# Altium PCB PCB_old.PcbDoc
Units mm, origin at the board's own origin, x right, y up, seen from the top; angles counter-clockwise.
Board outline 120 x 80 mm, 2 copper layers (Top Layer, Bottom Layer); 110 components, 84 nets, 483 pads, 0 vias.
Unrouted connection lines stored in the file: 293.
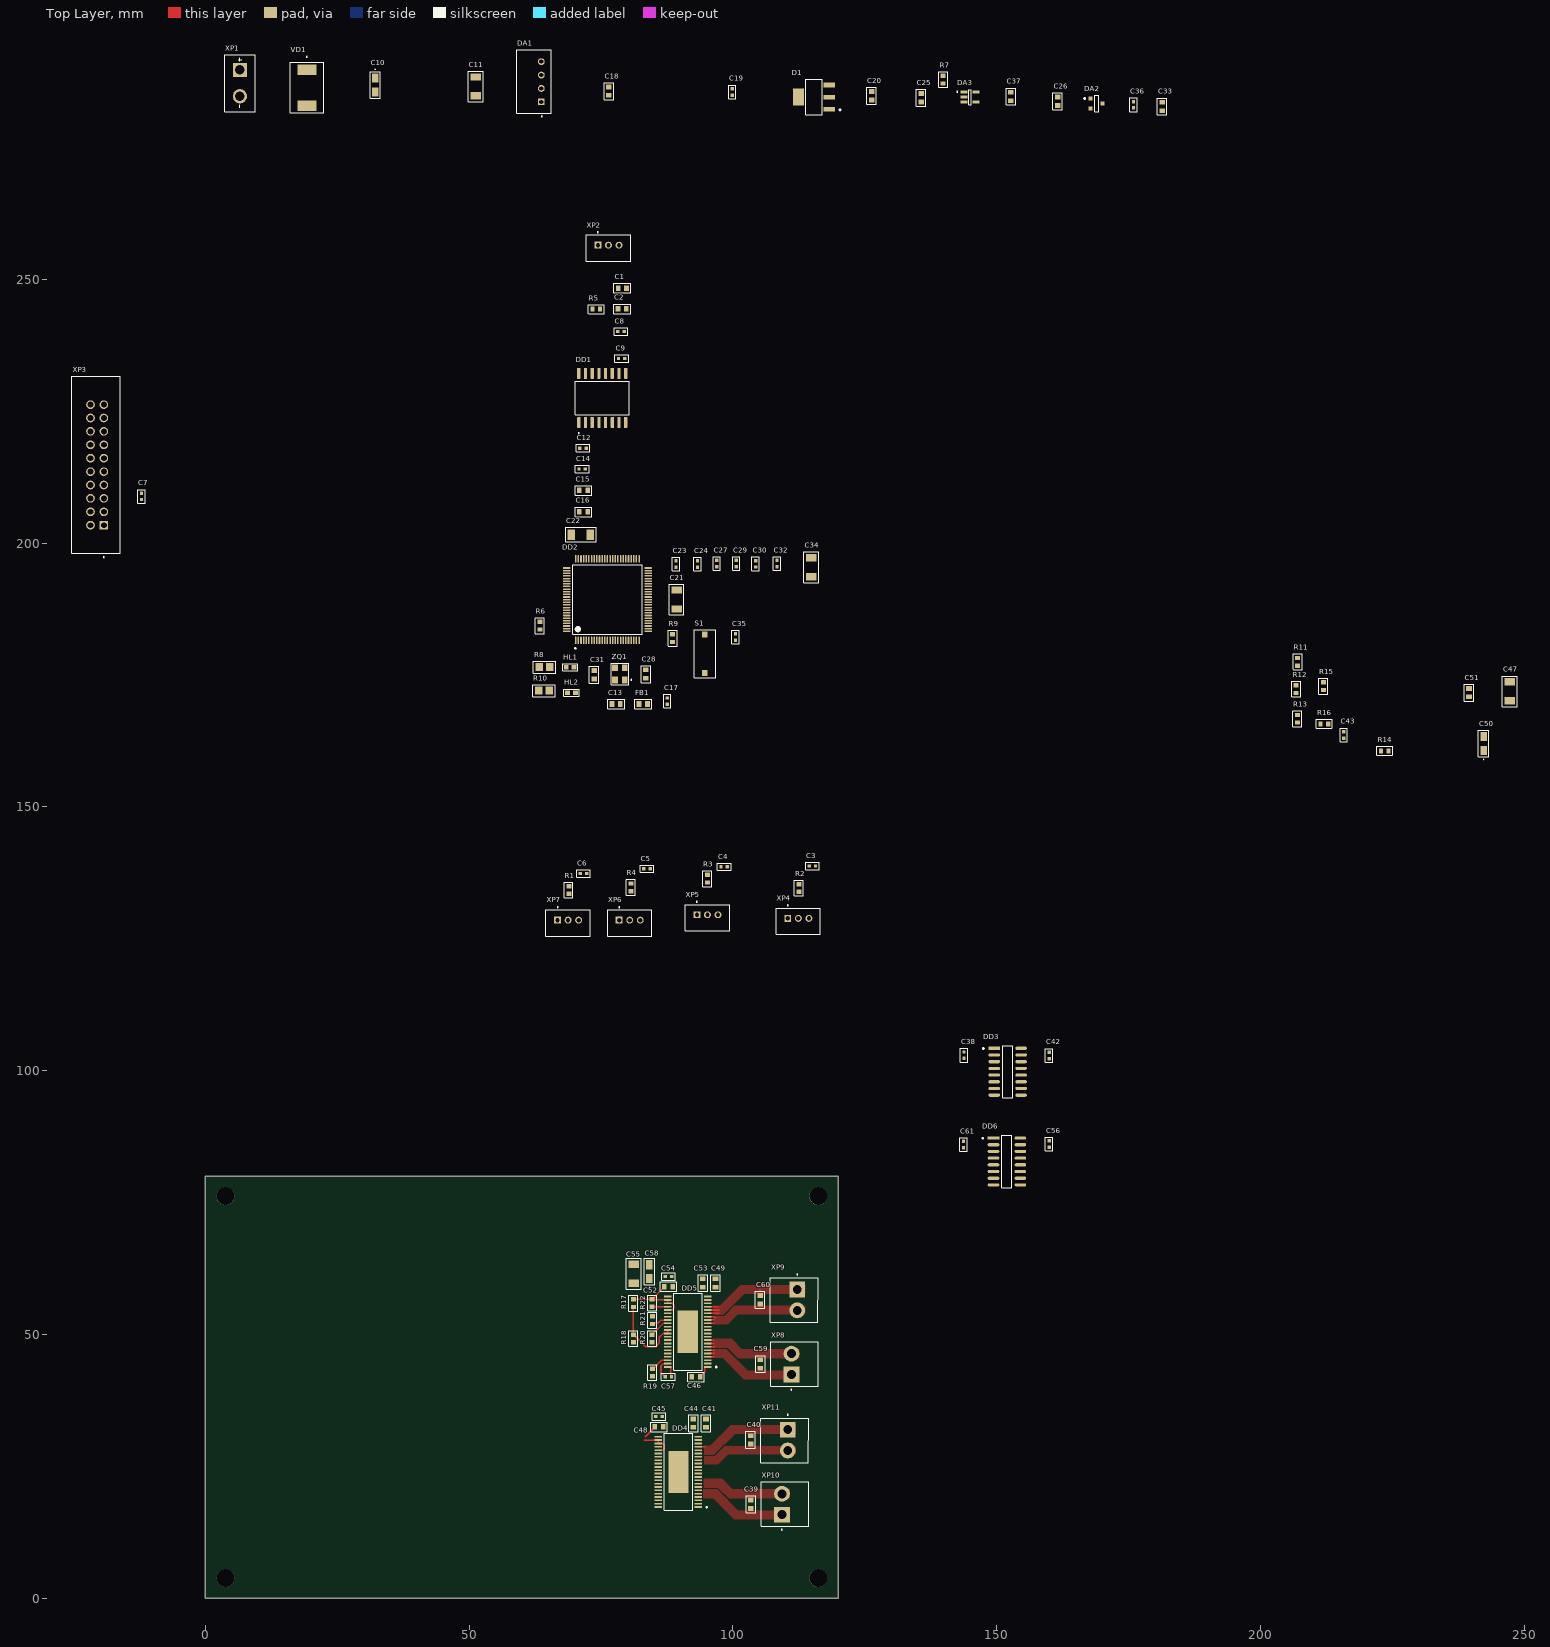
[diagram p0: Top Layer view]
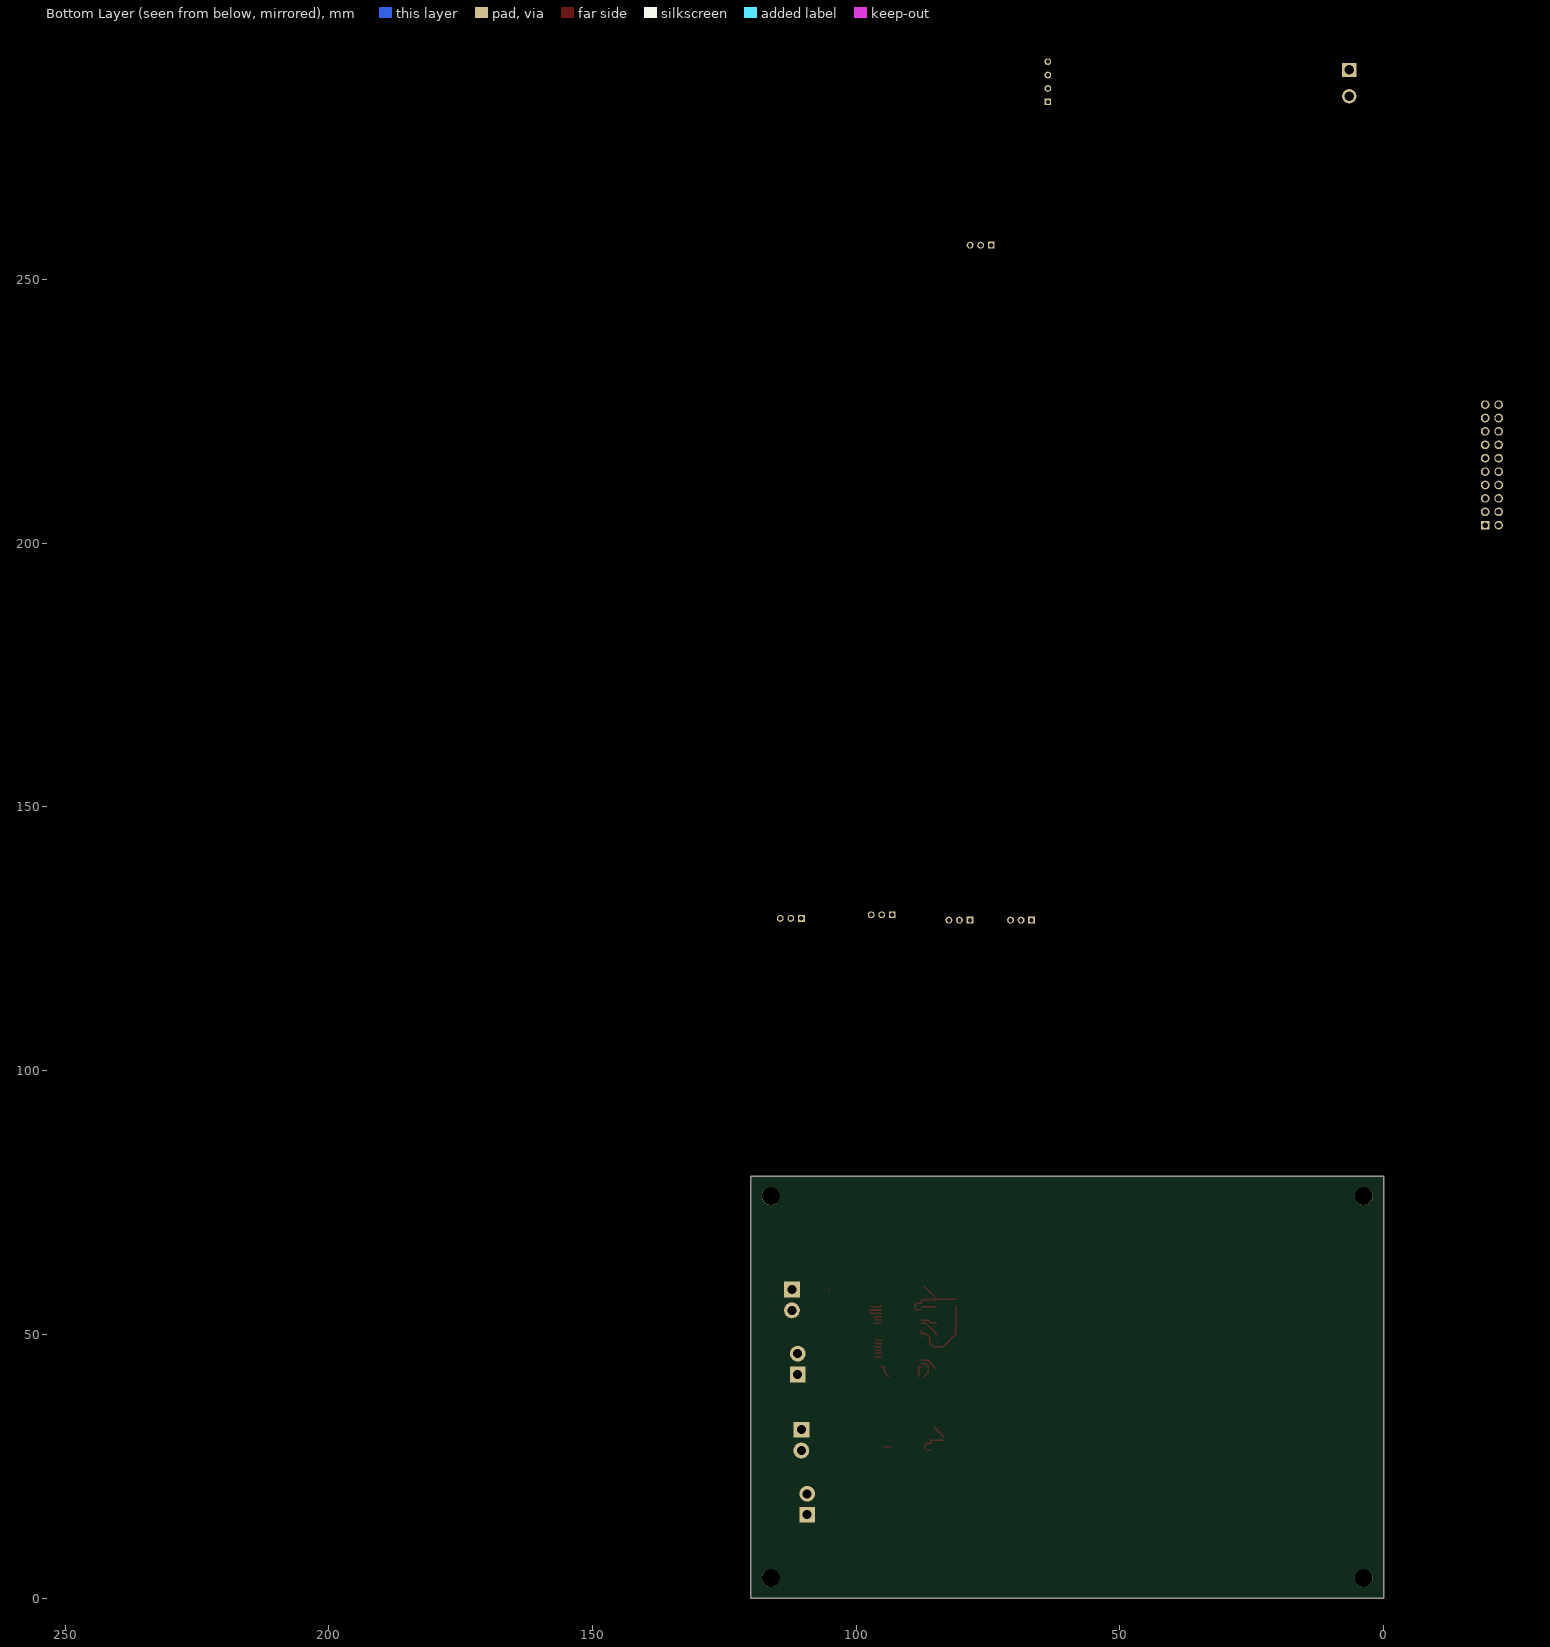
[diagram p1: Bottom Layer view, seen from below]

## Layer stack, top to bottom
Top Solder: solder mask 0.0102, Solder Resist, Dk 3.5
Top Layer: signal copper 0.0356
Dielectric 1: dielectric 0.32, FR-4, Dk 4.8
Bottom Layer: signal copper 0.0356
Bottom Solder: solder mask 0.0102, Solder Resist, Dk 3.5

## Board outline
0,0 0,80 120,80 120,0

## Design rules (kind name [scope] priority, off if disabled: settings)
Clearance [All] p1: gap=0.3 ignorepadtopadclearanceinfootprint=FALSE
HoleSize [All] p1: absolutevalues=TRUE maxlimit=5 minlimit=0.5 maxpercent=80.000 minpercent=20.000
PolygonConnect PolygonConnect_1 [(InNet('M1_OUT_+') OR InNet('M1_OUT_-') OR InNet('M2_OUT_+') OR InNet('M2_OUT_-') OR InNet('M3_OUT_+') OR InNet('M3_OUT_-') OR InNet('M4_OUT_+') OR InNet('M4_OUT_-'))] p1: connectstyle=Direct reliefconductorwidth=0.254 reliefentries=4 polygonreliefangle="90 Angle" airgapwidth=0.254
PolygonConnect [All] p2: thpad.connectstyle=Relief thpad.reliefconductorwidth=0.254 thpad.reliefentries=4 thpad.polygonreliefangle="90 Angle" thpad.airgapwidth=0.254 smdpad.connectstyle=Relief smdpad.reliefconductorwidth=0.254 smdpad.reliefentries=4 smdpad.polygonreliefangle="90 Angle" smdpad.airgapwidth=0.254 via.connectstyle=Direct via.reliefconductorwidth=0.254 via.reliefentries=4 via.polygonreliefangle="90 Angle" via.airgapwidth=0.254
RoutingVias [All] p1: holewidth=0.6 width=1 viastyle="Through Hole" minholewidth=0.6 minwidth=1 maxholewidth=0.6 maxwidth=1
SolderMaskExpansion [All] p1: expansion=0.102 istentingtop=FALSE
SupplyNets "Schematic Supply Nets_9" [InNet('DVDD1')] p1: voltage=0.000
SupplyNets "Schematic Supply Nets_8" [InNet('GND_PWR')] p2: voltage=0.000
SupplyNets "Schematic Supply Nets_7" [InNet('VDDA')] p3: voltage=0.000
SupplyNets "Schematic Supply Nets_6" [InNet('+5В')] p4: voltage=0.000
SupplyNets "Schematic Supply Nets_5" [InNet('GND_MCU')] p5: voltage=0.000
SupplyNets "Schematic Supply Nets_4" [InNet('+24В')] p6: voltage=0.000
SupplyNets "Schematic Supply Nets_3" [InNet('VDD')] p7: voltage=0.000
SupplyNets "Schematic Supply Nets_2" [InNet('VREF+')] p8: voltage=0.000
SupplyNets "Schematic Supply Nets_1" [InNet('GND_ISO')] p9: voltage=0.000
SupplyNets "Schematic Supply Nets" [InNet('DVDD2')] p10: voltage=0.000
Width [All] p1: maxlimit=3 minlimit=0.2 preferedwidth=0.3
29 further rules are at their usual default settings.

## Classes and differential pairs
component class Sheet1: C1 C2 C3 C4 C5 C6 C7 C8 C9 C10 C11 C12 C13 C14 C15 C16 C17 C18 C19 C20 C21 C22 C23 C24 C25 C26 C27 C28 C29 C30 C31 C32 C33 C34 C35 C36 C37 D1 DA1 DA2 DA3 DD1 DD2 FB1 HL1 HL2 R1 R2 R3 R4 R5 R6 R7 R8 R9 R10 S1 VD1 XP1 XP2 XP3 XP4 XP5 XP6 XP7 ZQ1
component class Drivers: C38 C39 C40 C41 C42 C43 C44 C45 C46 C47 C48 C49 C50 C51 C52 C53 C54 C55 C56 C57 C58 C59 C60 C61 DD3 DD4 DD5 DD6 R11 R12 R13 R14 R15 R16 R17 R18 R19 R20 R21 R22 XP8 XP9 XP10 XP11

## Components (designator, comment, footprint, x,y, rotation, side; value= is the part's Value field where it differs from the comment)
C1 "Capacitor" 0603C 79.042,248.389 r180 top value="10 мк"
C2 "Capacitor" 0603C 79.004,244.452 r180 top value="10 н"
C3 "Capacitor" 0402C 115.072,138.788 r180 top value="0,1 мк"
C4 "Capacitor" 0402C 98.346,138.661 r180 top value="0,1 мк"
C5 "Capacitor" 0402C 83.703,138.28 r180 top value="0,1 мк"
C6 "Capacitor" 0402C 71.676,137.391 r180 top value="0,1 мк"
C7 "Capacitor" 0402C -12.144,208.892 r90 top value="0,1 мк"
C8 "Capacitor" 0402C 78.788,240.134 r180 top value="0,1 мк"
C9 "Capacitor" 0402C 78.915,235.054 r180 top value="0,1 мк"
C10 "Capacitor" TC_A 32.179,286.87 r270 top value="470 мк"
C11 "Capacitor" 1206C 51.229,286.616 r90 top value="4,7 мк"
C12 "Capacitor" 0402C 71.587,218.036 r180 top value="0,1 мк"
C13 "Capacitor" 0603C 77.861,169.522 r0 top value="1 мк"
C14 "Capacitor" 0402C 71.422,214.099 r180 top value="0,1 мк"
C15 "Capacitor" 0603C 71.676,210.035 r0 top value="10 н"
C16 "Capacitor" 0603C 71.676,205.971 r0 top value="10 мк"
C17 "Capacitor" 0402C 87.551,170.068 r270 top value="0,1 мк"
C18 "Capacitor" 0603C 76.502,285.727 r90 top value="10 мк"
C19 "Capacitor" 0402C 99.87,285.562 r90 top value="0,1 мк"
C20 "Capacitor" 0603C 126.286,284.838 r90 top value="10 мк"
C21 "Capacitor" 1206C 89.329,189.334 r270 top value="2,2 мк"
C22 "Capacitor" 1206C 71.168,201.653 r180 top value="2,2 мк"
C23 "Capacitor" 0402C 89.202,196.065 r90 top value="0,1 мк"
C24 "Capacitor" 0402C 93.266,196.065 r90 top value="0,1 мк"
C25 "Capacitor" 0603C 135.684,284.457 r90 top value="1 мк"
C26 "Capacitor" 0603C 161.592,283.822 r90 top value="0,47 мк"
C27 "Capacitor" 0402C 96.949,196.154 r90 top value="0,1 мк"
C28 "Capacitor" 0603C 83.487,175.199 r270 top value="12 п"
C29 "Capacitor" 0402C 100.632,196.154 r90 top value="0,1 мк"
C30 "Capacitor" 0402C 104.315,196.103 r90 top value="0,1 мк"
C31 "Capacitor" 0603C 73.708,175.072 r90 top value="12 п"
C32 "Capacitor" 0402C 108.379,196.154 r90 top value="0,1 мк"
C33 "Capacitor" 0603C 181.404,282.806 r270 top value="1 мк"
C34 "Capacitor" 1206C 114.856,195.452 r90 top value="4,7 мк"
C35 "Capacitor" 0402C 100.505,182.222 r90 top value="0,1 мк"
C36 "Capacitor" 0402C 175.943,283.149 r270 top value="0,1 мк"
C37 "Capacitor" 0603C 152.702,284.711 r90 top value="1 мк"
C38 "Capacitor" 0402C 143.837,102.943 r90 top value="0,1 мк"
C39 "Capacitor" 0603C 103.426,17.797 r270 top value="2,2 н"
C40 "Capacitor" 0603C 103.376,29.998 r90 top value="2,2 н"
C41 "Capacitor" 0603C 94.901,33.173 r270 top value="10 н"
C42 "Capacitor" 0402C 159.966,102.892 r90 top value="0,1 мк"
C43 "Capacitor" 0402C 215.821,163.642 r270 top value="0,1 мк"
C44 "Capacitor" 0603C 92.501,33.173 r270 top value="10 н"
C45 "Capacitor" 0402C 86.001,34.423 r180 top value="0,1 мк"
C46 "Capacitor" 0603C 93,41.95 r180 top value="1 мк"
C47 "Capacitor" 1206C 247.317,171.913 r270 top value="4,7 мк"
C48 "Capacitor" 0603C 86.001,32.473 r180 top value="1 мк"
C49 "Capacitor" 0603C 96.7,59.75 r270 top value="10 н"
C50 "Capacitor" TC_A 242.364,162.029 r90 top value="470 мк"
C51 "Capacitor" 0603C 239.57,171.681 r90 top value="1 мк"
C52 "Capacitor" 0603C 87.8,59.05 r180 top value="1 мк"
C53 "Capacitor" 0603C 94.3,59.75 r270 top value="10 н"
C54 "Capacitor" 0402C 87.8,61 r180 top value="0,1 мк"
C55 "Capacitor" 1206C 81.225,61.5 r270 top value="4,7 мк"
C56 "Capacitor" 0402C 159.966,86.09 r90 top value="0,1 мк"
C57 "Capacitor" 0402C 87.75,41.975 r0 top value="0,1 мк"
C58 "Capacitor" TC_A 84.175,61.9 r90 top value="470 мк"
C59 "Capacitor" 0603C 105.225,44.375 r270 top value="2,2 н"
C60 "Capacitor" 0603C 105.175,56.575 r90 top value="2,2 н"
C61 "Capacitor" 0402C 143.71,86.001 r90 top value="0,1 мк"
D1 "LD1117S33CTR" SOT223 115.364,284.584 r180 top
DA1 "TME 2405S" CONV_TME_2405S 61.8,287.545 r90 top
DA2 "REF3030AIDBZR" SOT23-3 168.94,283.38 r0 top
DA3 "ADP150AUJZ-3.3" SOT23-5 144.955,284.584 r0 top
DD1 "ADM2682EBRIZ" SOIC-16W 75.232,227.561 r90 top
DD2 "STM32F407VGT6" LQFP100 76.208,189.312 r90 top
DD3 "ISO7762DWR" SOIC-16 152.092,99.806 r0 top
DD4 "DRV8262DDWR" HTSSOP44-DDW_TEX 89.65,23.925 r180 top
DD5 "DRV8262DDWR" HTSSOP44-DDW_TEX 91.449,50.502 r180 top
DD6 "ISO7762DWR" SOIC-16 151.965,82.788 r0 top
FB1 "BLM18AG102SN1D" 0603L 83.017,169.522 r0 top
HL1 "LED 0603 RED" 0603D_red 69.148,176.507 r0 top value=Красный
HL2 "LED 0603 GREEN" 0603D_green 69.39,171.681 r0 top value=Зелёный
R1 "Resistor" 0603R 68.882,134.253 r90 top value="10 к"
R2 "Resistor" 0603R 112.57,134.634 r90 top value="10 к"
R3 "Resistor" 0603R 95.171,136.412 r90 top value="10 к"
R4 "Resistor" 0603R 80.693,134.761 r90 top value="10 к"
R5 "Resistor" 0603R 74.089,244.452 r180 top value=120
R6 "Resistor" 0603R 63.421,184.381 r90 top value="10 к"
R7 "Resistor" 0603R 139.875,287.923 r270 top value="10 к"
R8 "Resistor" 0805R 64.294,176.507 r0 top value="1 к"
R9 "Resistor" 0603R 88.567,182.005 r270 top value="10 к"
R10 "Resistor" 0805R 64.183,172.062 r0 top value="1 к"
R11 "Resistor" 0603R 207.058,177.523 r270 top value="10 к"
R12 "Resistor" 0603R 206.804,172.353 r270 top value="4,7 к"
R13 "Resistor" 0603R 207.058,166.728 r90 top value="3,6 к"
R14 "Resistor" 0603R 223.605,160.632 r0 top value="100 к"
R15 "Resistor" 0603R 212.011,172.914 r90 top value="10 к"
R16 "Resistor" 0603R 212.138,165.712 r0 top value="15 к"
R17 "Resistor" 0603R 81.125,55.925 r90 top value="10 к"
R18 "Resistor" 0603R 81.125,49.225 r90 top value="15 к"
R19 "Resistor" 0603R 84.8,42.775 r90 top value="100 к"
R20 "Resistor" 0603R 84.7,49.225 r270 top value="3,6 к"
R21 "Resistor" 0603R 84.8,52.7 r90 top value="3,6 к"
R22 "Resistor" 0603R 84.7,55.95 r270 top value="10 к"
S1 "TSS-TD-19XA-XTR" TSS-TD-19XA-XTR 94.663,179.047 r270 top
VD1 "SM15T33A" SMC 19.225,286.362 r270 top value="30 В"
XP1 "XT30UPB-M" XT30UPB-M 6.525,287.251 r270 top
XP2 "JST PH-3" JST_B3B-PH-K-S(LF)(SN) 76.407,255.967 r180 top
XP3 "ARM JTAG 20" 3M_30320-6002HB -20.526,214.861 r90 top
XP4 "JST PH-3" JST_B3B-PH-K-S(LF)(SN) 112.411,128.332 r180 top
XP5 "JST PH-3" JST_B3B-PH-K-S(LF)(SN) 95.171,129.009 r180 top
XP6 "JST PH-3" JST_B3B-PH-K-S(LF)(SN) 80.439,127.993 r180 top
XP7 "JST PH-3" JST_B3B-PH-K-S(LF)(SN) 68.755,127.993 r180 top
XP8 "JST VH-2" B2P-VH 111.1,44.37 r90 top
XP9 "JST VH-2" B2P-VH 112.2,56.53 r270 top
XP10 "JST VH-2" B2P-VH 109.301,17.792 r90 top
XP11 "JST VH-2" B2P-VH 110.401,29.953 r270 top
ZQ1 "XTAL_GND" QSMD3.2x2.5 79.495,174.094 r180 top value="8 МГц"

## Footprints (in the part's own frame and the unit in brackets; to place one, negate y for a bottom-side part, rotate by r counter-clockwise, add the part's x,y. Pads: shape width x height; smd on the part's side, far side on the other; paste and mask are expansions set on the pad)
3M_30320-6002HB [mil]
  rect 64.5x64.5 / inner round 64.5 / far side rect 64.5x64.5 hole 43: 1(-450,-50)
  round 64.5 hole 43: 2(-450,50) 3(-350,-50) 4(-350,50) 5(-250,-50) 6(-250,50) 7(-150,-50) 8(-150,50) 9(-50,-50) 10(-50,50) 11(50,-50) 12(50,50) 13(150,-50) 14(150,50) 15(250,-50) 16(250,50) 17(350,-50) 18(350,50) 19(450,-50) 20(450,50)
  silkscreen extent -692,-173 661,189, body extent -650,-165 650,180, height 360
0402C [mm]
  rect 0.635x0.61 smd: 1(-0.597,0) 2(0.597,0)
  silkscreen extent -1.3,-0.7 1.3,0.7, body extent -0.51,-0.25 0.51,0.25, height 0.71
0603C [mm] "Chip Resistor, 2-Leads, Body 1,40x0,80mm, IPC Medium Density"
  rect 0.9x1.05 smd: 1(-0.8,0) 2(0.8,0)
  silkscreen extent -1.6,-0.9 1.6,0.9, body extent -0.85,-0.45 0.85,0.45, height 0.9
0603D_green [mm]
  rect 0.91x0.83 smd: 1(0.75,0) 2(-0.75,0)
  silkscreen extent -1.45,-0.66 1.45,0.66, body extent -0.8,-0.41 0.8,0.41, height 0.71
0603D_red [mm]
  rect 0.91x0.83 smd: 1(0.75,0) 2(-0.75,0)
  silkscreen extent -1.42,-0.64 1.42,0.64, body extent -0.8,-0.41 0.8,0.41, height 0.71
0603L [mm] "Chip Inductor, 2-Leads, Body 1,55x0,85mm, IPC Medium Density"
  rect 0.9x1.05 smd: 1(-0.8,0) 2(0.8,0)
  silkscreen extent -1.6,-0.9 1.6,0.9, body extent -0.8,-0.45 0.8,0.45, height 0.45
0603R [mm] "Chip Resistor, 2-Leads, Body 1.60x0.85mm, IPC Medium Density"
  rect 0.8x0.95 smd: 1(-0.725,0) 2(0.725,0)
  silkscreen extent -1.5,-0.8 1.5,0.9, body extent -0.8,-0.4 0.8,0.4, height 0.45
0805R [mm]
  rect 1.4x1.5 smd: 1(-1,0) 2(1,0)
  silkscreen extent -2.12,-1.12 2.12,1.12, body extent -1,-0.63 1,0.63, height 0.6
1206C [mm]
  rect 1.4x2 smd paste+0: 1(-1.8,0) 2(1.8,0)
  silkscreen extent -2.9,-1.4 2.9,1.4, body extent -1.6,-0.74 1.6,0.86, height 1.59
B2P-VH [mm]
  rect 3x3 / inner round 3 / far side rect 3x3 hole 1.7 mask+0.102: 1(-1.98,0)
  round 3 hole 1.7 mask+0.102: 2(1.98,0)
  silkscreen extent -4.93,-5.08 4.25,3.96, body extent -3.93,-4.8 3.93,3.7, height 10.9
CONV_TME_2405S [mm]
  rect 1.288x1.288 hole 0.78: 1(-3.85,-1.875)
  round 1.288 hole 0.78: 2(-1.31,-1.875) 3(1.23,-1.875) 4(3.77,-1.875)
  silkscreen extent -6.7,-3.8 6,2.8, body extent -5.7,-3.5 5.7,2.5, height 9.91
HTSSOP44-DDW_TEX [mil]
  rect 55.28x12.97 smd: 1(-149.64,262.5) 2(-149.64,237.5) 3(-149.64,212.5) 4(-149.64,187.5) 5(-149.64,162.5) 6(-149.64,137.5) 7(-149.64,112.5) 8(-149.64,87.5) 9(-149.64,62.5) 10(-149.64,37.5) 11(-149.64,12.5) 12(-149.64,-12.5) 13(-149.64,-37.5) 14(-149.64,-62.5) 15(-149.64,-87.5) 16(-149.64,-112.5) 17(-149.64,-137.5) 18(-149.64,-162.5) 19(-149.64,-187.5) 20(-149.64,-212.5) 21(-149.64,-237.5) 22(-149.64,-262.5) 23(149.64,-262.5) 24(149.64,-237.5) 25(149.64,-212.5) 26(149.64,-187.5) 27(149.64,-162.5) 28(149.64,-137.5) 29(149.64,-112.5) 30(149.64,-87.5) 31(149.64,-62.5) 32(149.64,-37.5) 33(149.64,-12.5) 34(149.64,12.5) 35(149.64,37.5) 36(149.64,62.5) 37(149.64,87.5) 38(149.64,112.5) 39(149.64,137.5) 40(149.64,162.5) 41(149.64,187.5) 42(149.64,212.5) 43(149.64,237.5) 44(149.64,262.5)
  rect 150x315 smd paste-196.85: 45(0,0)
  silkscreen extent -218,-288 106,287, body extent -159,-276 159,276, height 47
JST_B3B-PH-K-S(LF)(SN) [mm]
  rect 1.308x1.308 / inner round 1.308 / far side rect 1.308x1.308 hole 0.8: 1(2,-0.55)
  round 1.308 hole 0.8: 2(0,-0.55) 3(-2,-0.55)
  silkscreen extent -4.2,-3.1 4.2,2.5, body extent -3.95,-2.25 3.95,2.25, height 6
LQFP100 [mm] "TSQFP, 100-Leads, Body 14,00x14,00mm, Pitch 0,50mm, IPC Medium Density"
  oval 1.45x0.3 smd: 1(-7.725,6) 2(-7.725,5.5) 3(-7.725,5) 4(-7.725,4.5) 5(-7.725,4) 6(-7.725,3.5) 7(-7.725,3) 8(-7.725,2.5) 9(-7.725,2) 10(-7.725,1.5) 11(-7.725,1) 12(-7.725,0.5) 13(-7.725,0) 14(-7.725,-0.5) 15(-7.725,-1) 16(-7.725,-1.5) 17(-7.725,-2) 18(-7.725,-2.5) 19(-7.725,-3) 20(-7.725,-3.5) 21(-7.725,-4) 22(-7.725,-4.5) 23(-7.725,-5) 24(-7.725,-5.5) 25(-7.725,-6) 51(7.725,-6) 52(7.725,-5.5) 53(7.725,-5) 54(7.725,-4.5) 55(7.725,-4) 56(7.725,-3.5) 57(7.725,-3) 58(7.725,-2.5) 59(7.725,-2) 60(7.725,-1.5) 61(7.725,-1) 62(7.725,-0.5) 63(7.725,0) 64(7.725,0.5) 65(7.725,1) 66(7.725,1.5) 67(7.725,2) 68(7.725,2.5) 69(7.725,3) 70(7.725,3.5) 71(7.725,4) 72(7.725,4.5) 73(7.725,5) 74(7.725,5.5) 75(7.725,6)
  oval 0.3x1.45 smd: 26(-6,-7.725) 27(-5.5,-7.725) 28(-5,-7.725) 29(-4.5,-7.725) 30(-4,-7.725) 31(-3.5,-7.725) 32(-3,-7.725) 33(-2.5,-7.725) 34(-2,-7.725) 35(-1.5,-7.725) 36(-1,-7.725) 37(-0.5,-7.725) 38(0,-7.725) 39(0.5,-7.725) 40(1,-7.725) 41(1.5,-7.725) 42(2,-7.725) 43(2.5,-7.725) 44(3,-7.725) 45(3.5,-7.725) 46(4,-7.725) 47(4.5,-7.725) 48(5,-7.725) 49(5.5,-7.725) 50(6,-7.725) 76(6,7.725) 77(5.5,7.725) 78(5,7.725) 79(4.5,7.725) 80(4,7.725) 81(3.5,7.725) 82(3,7.725) 83(2.5,7.725) 84(2,7.725) 85(1.5,7.725) 86(1,7.725) 87(0.5,7.725) 88(0,7.725) 89(-0.5,7.725) 90(-1,7.725) 91(-1.5,7.725) 92(-2,7.725) 93(-2.5,7.725) 94(-3,7.725) 95(-3.5,7.725) 96(-4,7.725) 97(-4.5,7.725) 98(-5,7.725) 99(-5.5,7.725) 100(-6,7.725)
  silkscreen extent -9.35,-6.6 6.6,6.6, body extent -8,-8 8,8, height 1.6
QSMD3.2x2.5 [mm] "Кварцевый резонатор"
  rect 1.05x1.3 smd: 1(0,0) 2(1.85,-2.3) 3(0,-2.3) 3(1.85,0)
  silkscreen extent -1.37,-3.17 2.6,0.89, body extent -0.32,-2.75 2.18,0.45, height 0.8
SMC [mm]
  rect 2x3.6 smd: 1(3.415,0.021) 2(-3.385,0.021)
  silkscreen extent -5.94,-3.18 4.7,3.18, body extent -3.96,-2.93 3.99,2.97, height 2.65
SOIC-16 [mm] "SOT109-1"
  rect 2.204x0.608 smd: 1(-2.551,4.445)
  rrect100% 2.204x0.608 smd: 2(-2.551,3.175) 3(-2.551,1.905) 4(-2.551,0.635) 5(-2.551,-0.635) 6(-2.551,-1.905) 7(-2.551,-3.175) 8(-2.551,-4.445) 9(2.551,-4.445) 10(2.551,-3.175) 11(2.551,-1.905) 12(2.551,-0.635) 13(2.551,0.635) 14(2.551,1.905) 15(2.551,3.175) 16(2.551,4.445)
  silkscreen extent -4.72,-4.95 0.95,4.95, body extent -4.15,-5.45 4.15,5.45, height 0.25
SOIC-16W [mm]
  rrect25% 2.05x0.6 smd: 1(-4.655,4.445) 2(-4.655,3.175) 3(-4.655,1.905) 4(-4.655,0.635) 5(-4.655,-0.635) 6(-4.655,-1.905) 7(-4.655,-3.175) 8(-4.655,-4.445) 9(4.655,-4.445) 10(4.655,-3.175) 11(4.655,-1.905) 12(4.655,-0.635) 13(4.655,0.635) 14(4.655,1.905) 15(4.655,3.175) 16(4.655,4.445)
  silkscreen extent -6.78,-5.15 3.2,5.15, body extent -5.16,-5.15 5.16,5.15, height 2.65
SOT23-3 [mil]
  rect 30x30 smd: 1(-44.29,37.4) 2(-44.29,-37.6) 3(45.71,-0.1)
  silkscreen extent -93,-61 16,61, body extent -48,-60 50,59, height 41
SOT23-5 [mm]
  rect 1.32x0.59 smd: 1(-1.145,0.95) 2(-1.145,0) 3(-1.145,-0.95) 4(1.145,-0.95) 5(1.145,0.95)
  silkscreen extent -2.51,-1.4 0.25,1.4, body extent -1.4,-1.45 1.4,1.45, height 1.45
SOT223 [mm] "SOT223, ld1117"
  rect 2.15x0.9 smd: 1(-2.925,2.3) 2(-2.925,0) 3(-2.925,-2.3)
  rect 2.15x3.25 smd: 2(2.925,0)
  silkscreen extent -5.08,-3.35 1.55,3.35, body extent -3.56,-3.3 3.51,3.2, height 1.6
TC_A [mm] "Tantalum capacitor, type A,  1 pin - plus"
  rect 1.75x1.25 smd: 1(-1.325,0) 2(1.325,0)
  silkscreen extent -3.05,-0.97 2.5,1, body extent -1.73,-0.8 1.73,0.8, height 1.64
TSS-TD-19XA-XTR [mm]
  rect 1.1x1 smd: 1(-3.65,0) 2(3.65,0)
  silkscreen extent -4.52,-2.02 4.53,2.05, body extent -4.05,-1.85 4.05,1.85, height 2.55
XT30UPB-M [mm]
  rect 2.7x2.7 hole 1.8: 1(-2.5,0)
  round 2.7 hole 1.8: 2(2.5,0)
  silkscreen extent -5.4,-2.9 5.4,2.9, body extent -5.1,-2.6 5.1,2.6, height 10.7

## Part data
C1 C16 C18 C20: library part Capacitor_10u_10_10V_X7R_0603C, "Конденсатор 0603C ёмкостью 10 мк 10%, 10 В, X7R", Capacity (nF)=10000, Dielectric=X7R, Tolerance=10%, Voltage (V)=10, Datasheet=https://static.chipdip.ru/lib/893/DOC031893419.pdf, Part Number=Capacitor_10u_10_10V_X7R_0603C, Автор=glebmih
C2 C15 C41 C44 C49 C53: library part Capacitor_10n_10_50V_X7R_0603C, "Конденсатор 0603C ёмкостью 10 н 10%, 50 В, X7R", Capacity (nF)=10, Dielectric=X7R, Tolerance=10%, Voltage (V)=50, Part Number=Capacitor_10n_10_50V_X7R_0603C
C3 C4 C5 C6 C7 C8 C9 C12 C14 C17 C19 C23 C24 C27 C29 C30 C32 C35 C36 C38 C42 C43 C45 C54 C56 C57 C61: library part Capacitor_0,1u_10_16V_X7R_0603C, "Конденсатор 0402C ёмкостью 0,1 мк 10%, 16 В, X7R", Capacity (nF)=100, Dielectric=X7R, Tolerance=10%, Voltage (V)=16, Part Number=Capacitor_0,1u_10_16V_X7R_0603C, Автор=rreali
C10 C50 C58: library part Capacitor_470u_10_50V_TC_A, "Танталовый конденсатор", Capacity (uF)=470, Tolerance=0,1, Voltage (V)=50, Part Number=Capacitor_470u_10_50V_TC_A, Type=Tantalum
C11 C34 C47 C55: library part Capacitor_4,7u_10_50V_X7R_1206C, "Конденсатор 1206C ёмкостью 4,7 мк 10%, 50 В, X7R", Capacity (nF)=4700, Dielectric=X7R, Tolerance=10%, Voltage (V)=50, Part Number=Capacitor_4,7u_10_50V_X7R_1206C
C13 C25 C33 C37 C46 C48 C51 C52: library part Capacitor_1u_10_25V_X7R_0603C, "Конденсатор 0603C ёмкостью 1 мк 10%, 25 В, X7R", Capacity (nF)=1000, Dielectric=X7R, Tolerance=10%, Voltage (V)=25, Part Number=Capacitor_1u_10_25V_X7R_0603C
C21 C22: library part Capacitor_2,2u_10_50V_X7R_1206C, "Конденсатор 1206C ёмкостью 2,2 мк 10%, 50 В, X7R", Capacity (nF)=2200, Dielectric=X7R, Tolerance=10%, Voltage (V)=50, Part Number=Capacitor_2,2u_10_50V_X7R_1206C
C26: library part Capacitor_0,47u_10_50V_X7R_0603C, "Конденсатор 0603C ёмкостью 0,47 мк 10%, 50 В, X7R", Capacity (nF)=470, Dielectric=X7R, Tolerance=10%, Voltage (V)=50, Part Number=Capacitor_0,47u_10_50V_X7R_0603C
C28 C31: library part Capacitor_12p_5_50V_NP0_0603C, "Конденсатор 0603C ёмкостью 12 п 5%, 50 В, NP0", Capacity (nF)=0,012, Dielectric=NP0, Tolerance=5%, Voltage (V)=50, Part Number=Capacitor_12p_5_50V_NP0_0603C, Автор=glebmih
C39 C40 C59 C60: library part Capacitor_2,2n_10_50V_X7R_0603C, "Конденсатор 0603C ёмкостью 2,2 н 10%, 50 В, X7R", Capacity (nF)=2,2, Dielectric=X7R, Tolerance=10%, Voltage (V)=50, Part Number=Capacitor_2,2n_10_50V_X7R_0603C
D1: "Линейный стабилизатор напряжения", Part Number=LD1117S33CTR
DA1: "DC/DC преобразователь, 1Вт, вход 21.6-26.4В, выход 5В/ 200мА", Part Number="TME 2405S"
DA2: "Источник опорного напряжения, 3В", Datasheet=https://static.chipdip.ru/lib/248/DOC000248445.pdf, Part Number=REF3030AIDBZR, Автор=glebmih
DA3: "Стабилизатор напряжения 3.3В 150мА", Datasheet=https://static.chipdip.ru/lib/986/DOC003986581.pdf, Part Number=ADP150AUJZ-3.3, Автор=glebmih
DD1: "Изолированный RS-485 приемопередатчик, с встроенным DC-DC преобразователем", Part Number=ADM2682EBRIZ
DD2: "Микроконтроллер", Part Number=STM32F407VGT6
DD3 DD6: "Шестиканальный цифровой изолятор", Part Number=ISO7762DWR
DD4 DD5: "Спаренный драйвер управления ДПТ", Part Number=DRV8262DDWR
FB1: "Дроссель подавления ЭМП", Datasheet=https://www.chipdip.ru/product/blm18ag102sn1d-1-kom-0.4a-0603-drossel-podavleniya-murata-9000029220, Part Number=BLM18AG102SN1D, Автор=glebmih
HL1: "Светодиод 0603 Красный", Part Number="LED 0603 RED", Автор=rreali
HL2: "Светодиод 0603 Зелёный", Part Number="LED 0603 GREEN", Автор=rreali
R1 R2 R3 R4 R6 R7 R9 R11 R15 R17 R22: library part Resistor_10k_1_0603, "Резистор номиналом 10 кОм 1%", Tolerance=1%, Part Number=Resistor_10k_1_0603
R5: library part Resistor_120_1_0603, "Резистор номиналом 120 Ом 1%", Tolerance=1%, Part Number=Resistor_120_1_0603
R8 R10: library part Resistor_1k_0805, "Резистор номиналом 1 кОм 1%", Tolerance=1%, Part Number=Resistor_1k_0805, Автор=glebmih
R12: library part Resistor_4.7k_1_0603, "Резистор номиналом 4,7 кОм 1%", Tolerance=1%, Part Number=Resistor_4.7k_1_0603
R13 R20 R21: library part Resistor_3.6k_1_0603, "Резистор номиналом 3,6 кОм 1%", Tolerance=1%, Part Number=Resistor_3.6k_1_0603
R14 R19: library part Resistor_100k_1_0603, "Резистор номиналом 100 кОм 1%", Tolerance=1%, Part Number=Resistor_100k_1_0603
R16 R18: library part Resistor_15k_1_0603, "Резистор номиналом 15 кОм 1%", Tolerance=1%, Part Number=Resistor_15k_1_0603
S1: "Тактовая кнопка", Datasheet=https://cdn.promelec.ru/upload/items/2023/04/17/TSS-TD-19XA.pdf, Part Number=TSS-TD-19XA-XTR, Автор=glebmih
VD1: "Защитный диод на 30 В, рассеиваемая мощность 1500 Вт", Power (W)=1500, Voltage (V)=30, Part Number=SM15T33A
XP1: "Вилка прямая силовая 2-контактная на плату, 15А, 500В", Datasheet=https://www.tme.eu/en/details/xt30upb-m/dc-power-connectors/amass/, Part Number=XT30UPB-M, Автор=Гидролиба
XP2 XP4 XP5 XP6 XP7: "Вилка штыревая 3-контактная на плату прямая с ключом, шаг 2,0 мм", Datasheet=https://ihmevekotin.fi/liittimet/314-jst-ph-3-pinninen-liitaentaejohto.html, Part Number="JST PH-3", Автор=Макс
XP3: "Вилка штыревая двухрядная 20-контактная, шаг 2,54", Datasheet=https://support.arm.com/documentation/dui0499/a/Target-Interface-Connections/ARM-JTAG-20, Part Number="ARM JTAG 20", Автор=Макс
XP8 XP9 XP10 XP11: "Вилка силовая 2-контактная на плату прямая, шаг 3,96 мм", Datasheet=https://www.tme.eu/en/details/b2p-vh/raster-signal-connectors-3-96mm/jst/b2p-vh-lf-sn/, Part Number="JST VH-2", Автор=Макс
ZQ1: "Кварцевый резонатор с входом земли", Part Number=XTAL_GND

## Free pads (board coordinates)
  round 3.4 hole 3.4 unplated: 3(3.8,3.8) 3(3.8,76.2) 3(116.2,3.8) 3(116.2,76.2)

## Nets (pads, with @x,y where several pads share a name; then routed paths per layer and width w, separated by ;. In a path a pad name is that pad's centre, name@x,y a point inside that pad or via, vN(x,y) a via of type N, cw(c..) or ccw(c..) an arc to the next point about the centre after c; other vN are vias at no path point)
+5В: C18.2 C19.2 C25.2 D1.3 DA1.4 DA3.1 R7.1
+24В: C10.1 C11.2 C41.2 C44.2 C46.2 C47.2 C49.2 C50.1 C51.2 C53.2 C55.2 C58.1 DA1.2 DD4.2 DD4.11 DD4.12 DD4.21 DD5.2 DD5.11 DD5.12 DD5.21 R14.2 R19.1 VD1.2 XP1.1
ADC_POT1: C3.2 DD2.23 R2.2
ADC_POT2: C4.2 DD2.24 R3.2
ADC_POT3: C5.2 DD2.25 R4.2
ADC_POT4: C6.2 DD2.26 R1.2
BUTTON: C35.2 DD2.29 R9.1 S1.1
DRV1_DIR1: DD3.14 DD5.40
DRV1_DIR2: DD3.12 DD5.38
DRV1_PWM1: DD3.15 DD5.41
DRV1_PWM2: DD3.13 DD5.39
DRV2_DIR3: DD4.40 DD6.14
DRV2_DIR4: DD4.38 DD6.12
DRV2_PWM3: DD4.41 DD6.15
DRV2_PWM4: DD4.39 DD6.13
DVDD1: C42.2 C52.2 C54.2 DD3.16 DD5.24 DD5.25 DD5.27 R17.2 R22.1 | length 13.7
  Top Layer w0.3: R17.2@81.075,56.65 81.1,56.675 84.875,56.675 85.015,56.535 DD5.24 DD5.25 87.663,55.885 88.531,55.885 88.8,55.616 88.8,54.914 88.531,54.645 87.663,54.645 DD5.27 ; R22.1@84.95,56.675 85.2,56.925 85.2,57.175 87,58.975 C52.2
DVDD2: C45.2 C48.2 C56.2 DD4.24 DD4.25 DD4.27 DD6.16 R11.1 R15.2 | length 9
  Top Layer w0.3: 83.216,29.957 DD4.24 DD4.25 ; 83.401,30.598 C48.2@85.201,32.398 ; DD4.27@85.864,28.067 86.732,28.067 87.001,28.336 87.001,29.039 86.732,29.308 DD4.25@85.864,29.308
FAULT_DRV_1: DD3.11 DD5.26 R22.2 | length 2.8
  Top Layer w0.3: R22.2@84.875,55.225 84.9,55.25 87.634,55.25 DD5.26
FAULT_DRV_2: DD4.26 DD6.11 R11.2
GND_ISO: C1.1 C2.1 C8.1 C9.1 DD1.9 DD1.16 XP2.3
GND_MCU: C3.1 C4.1 C5.1 C6.1 C7.1 C12.2 C13.1 C14.2 C15.1 C16.1 C17.1 C18.1 C19.1 C20.1 C21.2 C22.2 C23.1 C24.1 C25.1 C26.1 C27.1 C28.1 C29.1 C30.1 C31.1 C32.1 C33.1 C34.1 C35.1 C36.1 C37.1 C38.1 C61.1 D1.1 DA1.3 DA2.3 DA3.2 DD1.1 DD1.8 DD2.10 DD2.20 DD2.27 DD2.74 DD2.99 DD3.8 DD6.8 R6.1 R8.1 R10.1 S1.2 XP3.4 XP3.6 XP3.8 XP3.10 XP3.12 XP3.14 XP3.16 XP3.17 XP3.18 XP3.19 XP3.20 XP4.3 XP5.3 XP6.3 XP7.3 ZQ1.3
GND_PWR: C10.2 C11.1 C41.1 C42.1 C44.1 C45.1 C47.1 C48.1 C49.1 C50.2 C52.1 C53.1 C54.1 C55.1 C56.1 C58.2 DA1.1 DD3.9 DD3.10 DD4.3 DD4.10 DD4.13 DD4.20 DD4.22 DD4.23 DD4.28 DD4.29 DD4.35 DD4.37 DD4.45 DD5.3 DD5.10 DD5.13 DD5.20 DD5.22 DD5.23 DD5.28 DD5.29 DD5.35 DD5.37 DD5.45 DD6.9 DD6.10 R12.1 R13.1 R16.1 R18.1 R20.2 R21.2 VD1.1 XP1.2 | length 0.1
  Top Layer w0.3: R20.2@84.675,48.5 R20.2@84.75,48.5 ; DD5.35@87.634,49.535 DD5.35
JTAG_TCK: DD2.76 XP3.9
JTAG_TDI: DD2.77 XP3.5
JTAG_TDO: DD2.89 XP3.13
JTAG_TMS: DD2.72 XP3.7
JTAG_TRST: DD2.90 XP3.3
LED_ERROR: DD2.8 HL1.1
LED_OK: DD2.7 HL2.1
M1_OUT_+: C59.2 DD5.4 DD5.5 DD5.6 XP8.1 | length 3.5
  Top Layer w0.3: DD5.4 95.265,45.755 96.33,45.755 96.35,45.775 ; DD5.5 95.265,46.39 96.41,46.39 96.425,46.375 ; DD5.6 95.265,46.995 96.405,46.995 96.425,46.975
M1_OUT_-: C59.1 DD5.7 DD5.8 DD5.9 XP8.2 | length 3.5
  Top Layer w0.3: DD5.7 95.265,47.66 96.485,47.66 96.5,47.675 96.575,47.675 ; DD5.8 95.265,48.265 96.31,48.265 96.319,48.257 ; DD5.9 95.26,48.925 96.35,48.925
M2_OUT_+: C60.2 DD5.17 DD5.18 DD5.19 XP9.1 | length 6.1
  Top Layer w0.3: DD5.17 97.245,53.995 97.3,54.05 ; DD5.18 97.38,54.63 97.4,54.65 ; DD5.19 96.985,55.265 97,55.25 ; 97.285,55.265 97.3,55.25 ; 105.1,58.45 105.2,58.35
M2_OUT_-: C60.1 DD5.14 DD5.15 DD5.16 XP9.2 | length 3.9
  Top Layer w0.3: DD5.14 95.26,52.1 96.5,52.1 ; DD5.15 95.265,52.74 96.406,52.74 96.413,52.746 ; DD5.16 95.265,53.375 96.433,53.375 96.633,53.175 96.65,53.175
M3_OUT_+: C39.2 DD4.4 DD4.5 DD4.6 XP10.1
M3_OUT_-: C39.1 DD4.7 DD4.8 DD4.9 XP10.2
M4_OUT_+: C40.2 DD4.17 DD4.18 DD4.19 XP11.1 | length 1.3
  Top Layer w0.3: DD4.19 93.463,28.675 94.725,28.675
M4_OUT_-: C40.1 DD4.14 DD4.15 DD4.16 XP11.2
MCU_DIR_M1: DD2.51 DD3.3
MCU_DIR_M2: DD2.52 DD3.5
MCU_DIR_M3: DD2.53 DD6.3
MCU_DIR_M4: DD2.54 DD6.5
MCU_FAULT_DRV_1: DD2.81 DD3.6
MCU_FAULT_DRV_2: DD2.82 DD6.6
MCU_PWM_M1: DD2.31 DD3.2
MCU_PWM_M2: DD2.32 DD3.4
MCU_PWM_M3: DD2.35 DD6.2
MCU_PWM_M4: DD2.36 DD6.4
NetC1_2: C1.2 C2.2 C8.2 C9.2 DD1.10 DD1.15
NetC17_2: C17.2 DD2.22 FB1.2
NetC21_1: C21.1 DD2.49
NetC22_1: C22.1 DD2.73
NetC28_2: C28.2 DD2.13 ZQ1.1
NetC31_2: C31.2 DD2.12 ZQ1.2
NetC43_1: C43.1 DD4.43
NetC43_2: C43.2 DD4.44
NetC46_1: C46.1 DD5.1 | length 2.8
  Top Layer w0.3: C46.1 93.8,42.025 94.698,42.923 94.698,43.82 94.713,43.835 DD5.1
NetC51_1: C51.1 DD4.1
NetC57_1: C57.1 DD5.43 | length 3.9
  Top Layer w0.3: C57.1 87.141,41.975 86.375,42.741 86.375,44.065 86.765,44.455 87.634,44.455 DD5.43
NetC57_2: C57.2 DD5.44 | length 2.5
  Top Layer w0.3: DD5.44 88.171,43.835 88.186,43.82 88.186,42.13 88.341,41.975 C57.2
NetDA3_3: DA3.3 R7.2
NetDD1_11: DD1.11 DD1.14 R5.1 XP2.2
NetDD1_12: DD1.12 DD1.13 R5.2 XP2.1
NetDD2_94: DD2.94 R6.2
NetDD4_30: DD4.30 R12.2
NetDD4_31: DD4.31 R13.2
NetDD4_33: DD4.33 DD4.34 R15.1 R16.2
NetDD4_42: DD4.42 R14.1
NetDD5_30: DD5.30 R21.1 | length 3.2
  Top Layer w0.3: R21.1 85.05,52.225 85.868,52.225 86.353,52.71 87.634,52.71 DD5.30
NetDD5_31: DD5.31 R20.1 | length 3.9
  Top Layer w0.3: R20.1 84.775,49.95 85.025,50.2 85.025,50.335 86.765,52.075 87.634,52.075 DD5.31
NetDD5_33: DD5.33 DD5.34 R17.1 R18.2 | length 15.1
  Top Layer w0.3: R17.1 R18.2 81.2,49.95 83.5,47.65 85.361,47.65 86.061,48.349 86.061,49.466 86.765,50.17 87.634,50.17 DD5.34 DD5.33
NetDD5_42: DD5.42 R19.2 | length 3.5
  Top Layer w0.3: R19.2 84.875,43.5 86.465,45.09 87.634,45.09 DD5.42
NetHL1_2: HL1.2 R8.2
NetHL2_2: HL2.2 R10.2
NetR1_1: R1.1 XP7.2
NetR2_1: R2.1 XP4.2
NetR3_1: R3.1 XP5.2
NetR4_1: R4.1 XP6.2
RESET: C7.2 DD2.14 XP3.15
RS485_DIR: DD1.4 DD1.5 DD2.67
UART_RX: DD1.3 DD2.69
UART_TX: DD1.6 DD2.68
VDD: C12.1 C14.1 C15.2 C16.2 C20.2 C23.2 C24.2 C27.2 C29.2 C30.2 C32.2 C34.2 C38.2 C61.2 D1.2 DD1.2 DD1.7 DD2.6 DD2.11 DD2.19 DD2.28 DD2.50 DD2.75 DD2.100 DD3.1 DD6.1 R9.2 XP3.1
VDDA: C13.2 C26.2 C37.2 DA2.1 DA3.5 FB1.1
VREF+: C33.2 C36.2 DA2.2 DD2.21 XP4.1 XP5.1 XP6.1 XP7.1
pads on no net: DA3.4 DD2.1 DD2.2 DD2.3 DD2.4 DD2.5 DD2.9 DD2.15 DD2.16 DD2.17 DD2.18 DD2.30 DD2.33 DD2.34 DD2.37 DD2.38 DD2.39 DD2.40 DD2.41 DD2.42 DD2.43 DD2.44 DD2.45 DD2.46 DD2.47 DD2.48 DD2.55 DD2.56 DD2.57 DD2.58 DD2.59 DD2.60 DD2.61 DD2.62 DD2.63 DD2.64 DD2.65 DD2.66 DD2.70 DD2.71 DD2.78 DD2.79 DD2.80 DD2.83 DD2.84 DD2.85 DD2.86 DD2.87 DD2.88 DD2.91 DD2.92 DD2.93 DD2.95 DD2.96 DD2.97 DD2.98 DD3.7 DD4.32 DD4.36 DD5.32 DD5.36 DD6.7 XP3.2 XP3.11

## Polygon pours and split planes (outlines as drawn)
M4_OUT_+ on Top Layer "M4_OUT_+_L01_P000" (solid, pour order 0): 94.601,27.173 96.401,27.172 100.401,31.173 111.901,31.173 111.901,32.772 99.601,32.772 95.701,28.873 94.601,28.873
M4_OUT_- on Top Layer "M4_OUT_-_L01_P003" (solid, pour order 3): 94.613,25.334 97.188,25.334 99.088,27.234 111.888,27.234 111.888,28.834 98.288,28.834 96.458,27.003 94.613,27.003
M3_OUT_- on Top Layer "M3_OUT_-_L01_P005" (solid, pour order 5): 94.52,22.592 97.945,22.592 99.914,20.623 110.776,20.623 110.776,18.898 99.189,18.898 97.32,20.767 94.52,20.767
M3_OUT_+ on Top Layer "M3_OUT_+_L01_P004" (solid, pour order 4): 94.413,20.623 96.988,20.623 101.038,16.572 110.788,16.572 110.788,14.948 100.263,14.948 96.258,18.953 94.413,18.953
M1_OUT_- on Top Layer "M1_OUT_-_L01_P005" (solid, pour order 5): 96.319,49.169 99.744,49.169 101.713,47.2 112.575,47.2 112.575,45.475 100.988,45.475 99.119,47.344 96.319,47.344
M2_OUT_- on Top Layer "M2_OUT_-_L01_P003" (solid, pour order 3): 96.413,51.912 98.988,51.912 100.888,53.812 113.688,53.812 113.688,55.412 100.088,55.412 98.257,53.581 96.413,53.581
M1_OUT_+ on Top Layer "M1_OUT_+_L01_P004" (solid, pour order 4): 96.212,47.2 98.787,47.2 102.837,43.15 112.587,43.15 112.587,41.525 102.062,41.525 98.057,45.531 96.212,45.531
M2_OUT_+ on Top Layer "M2_OUT_+_L01_P000" (solid, pour order 0): 96.4,53.75 98.2,53.75 102.2,57.75 113.7,57.75 113.7,59.35 101.4,59.35 97.5,55.45 96.4,55.45

## Silkscreen, mask and mechanical layers (free items; w line width, h text height)
Mechanical 1:
  the board outline again, w0.254